# Altium PCB STM32_DevBoard.PcbDoc (part 1 of 2)
Units mm, origin at the board's own origin, x right, y up, seen from the top; angles counter-clockwise.
Board outline 80.64 x 69.55 mm, 2 copper layers (Top Layer, Bottom Layer); 79 components, 67 nets, 279 pads, 244 vias.
Unrouted connection lines stored in the file: 67.
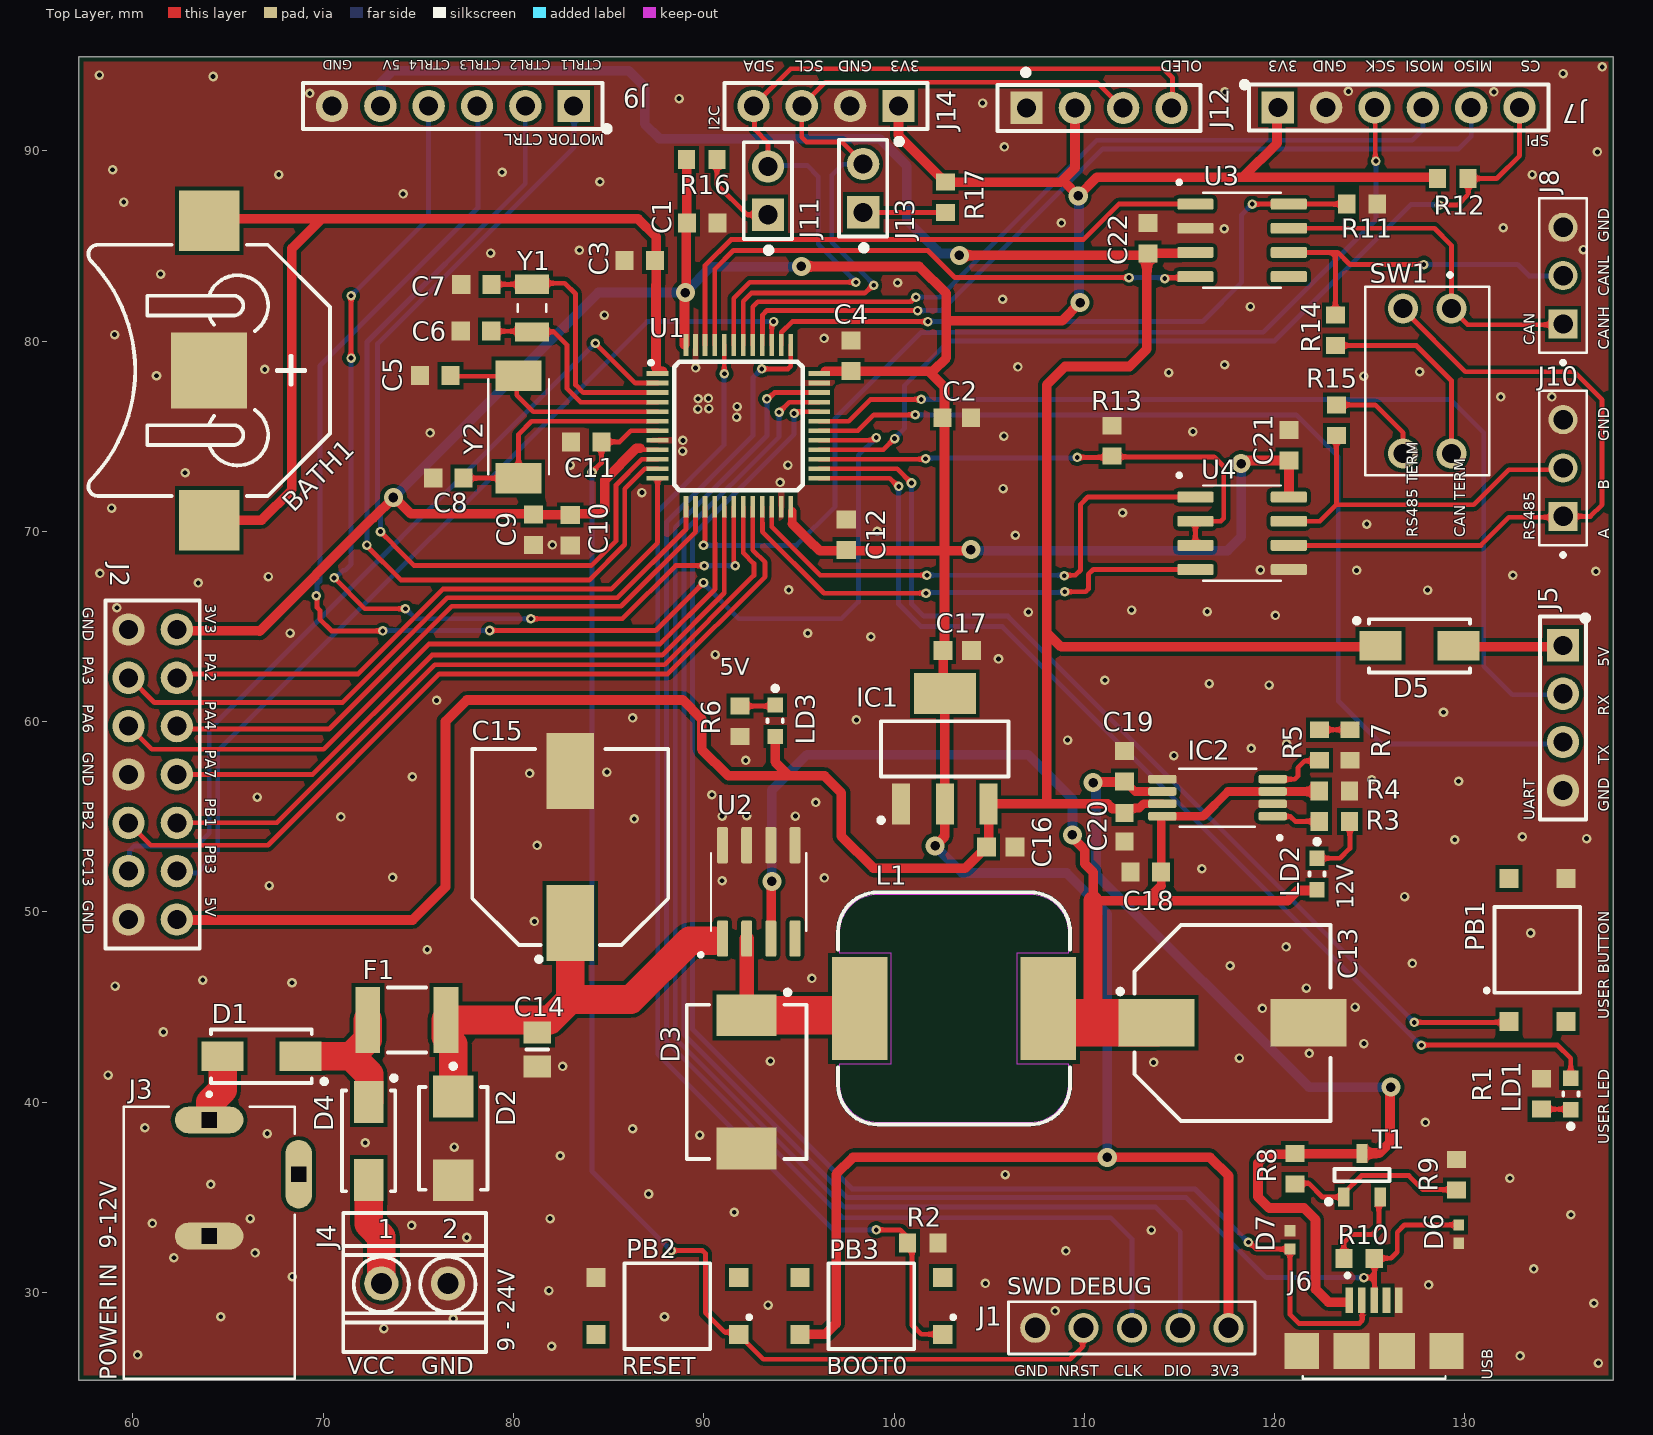
[diagram p0: Top Layer view]
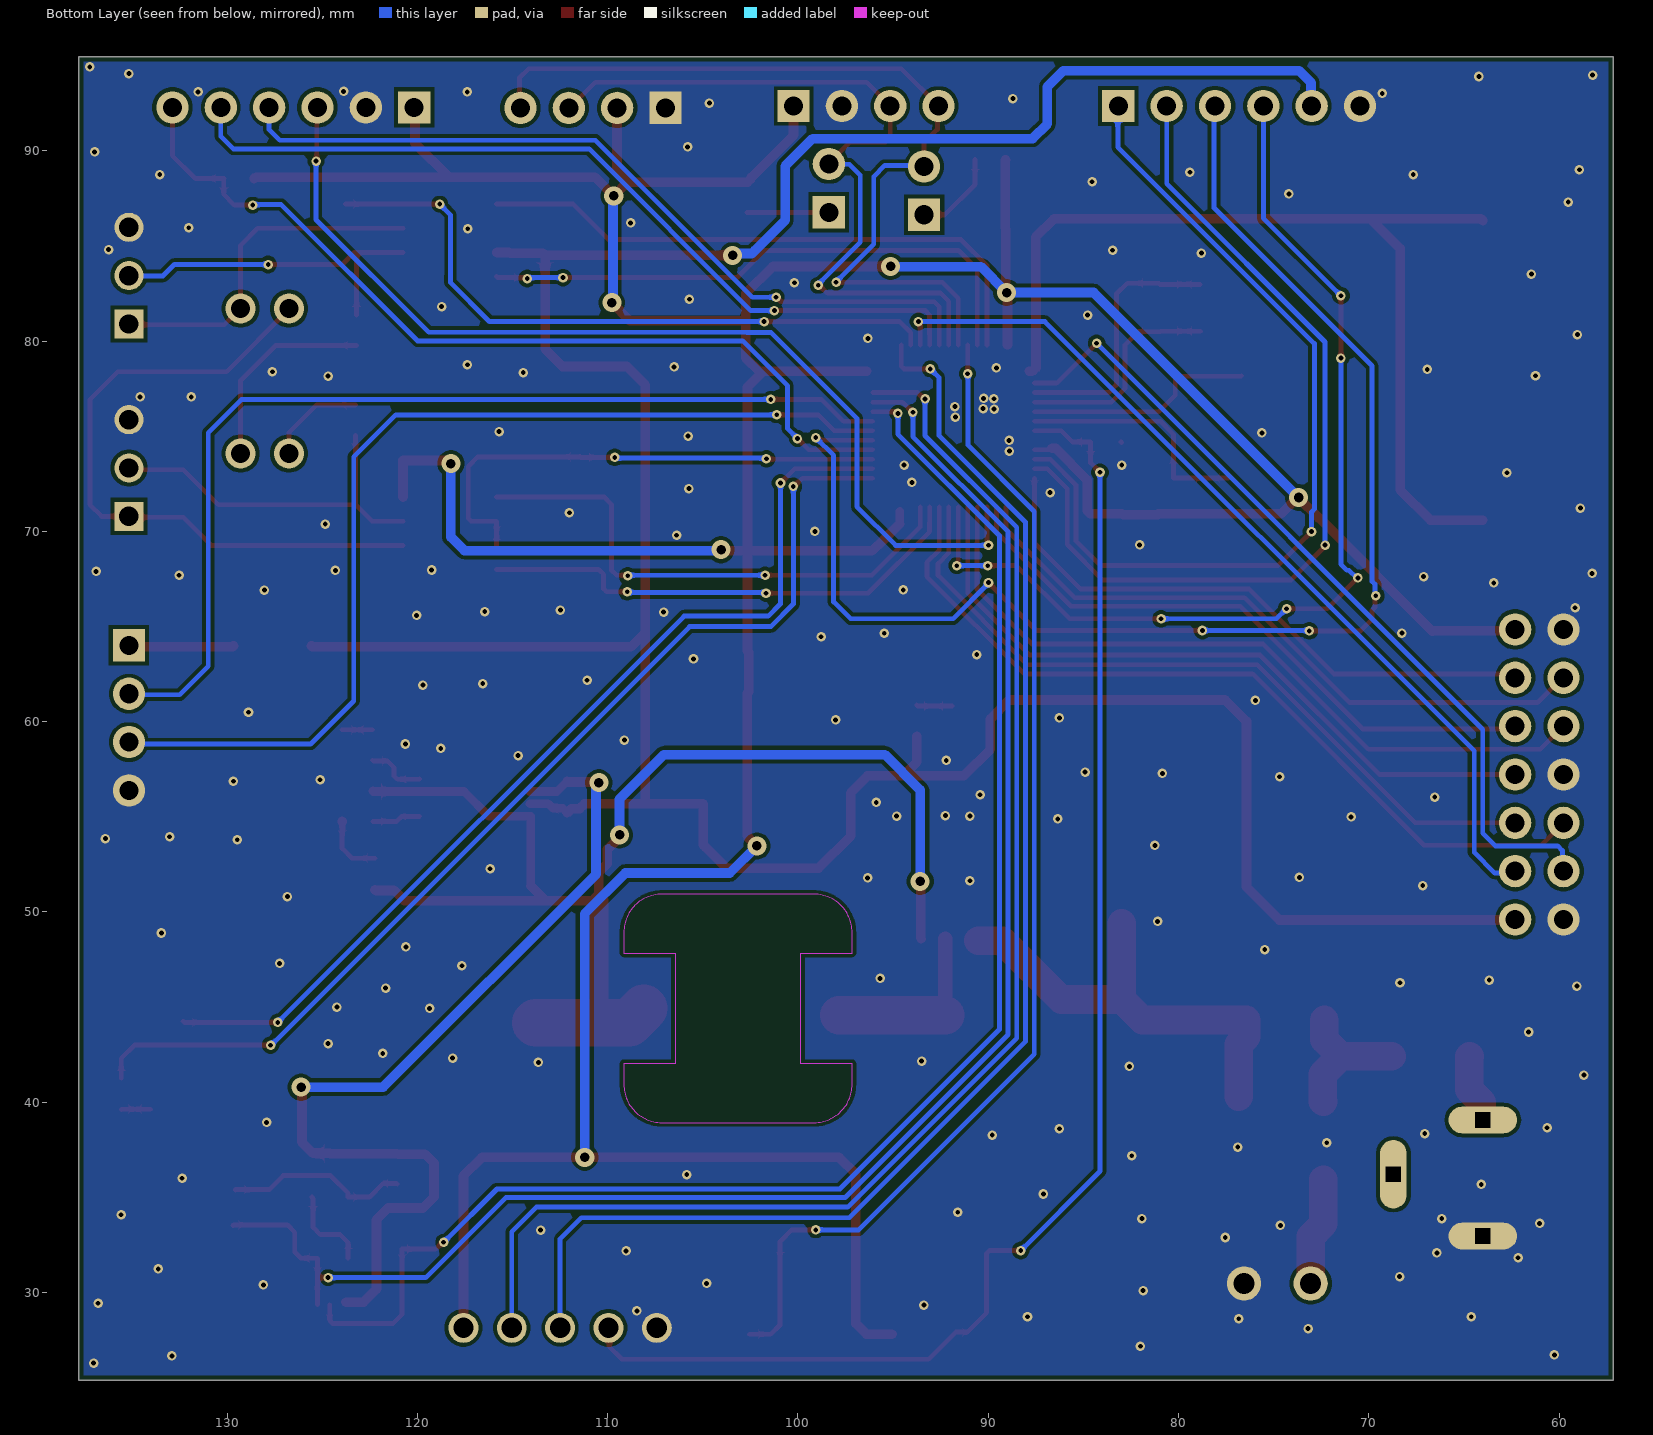
[diagram p1: Bottom Layer view, seen from below]
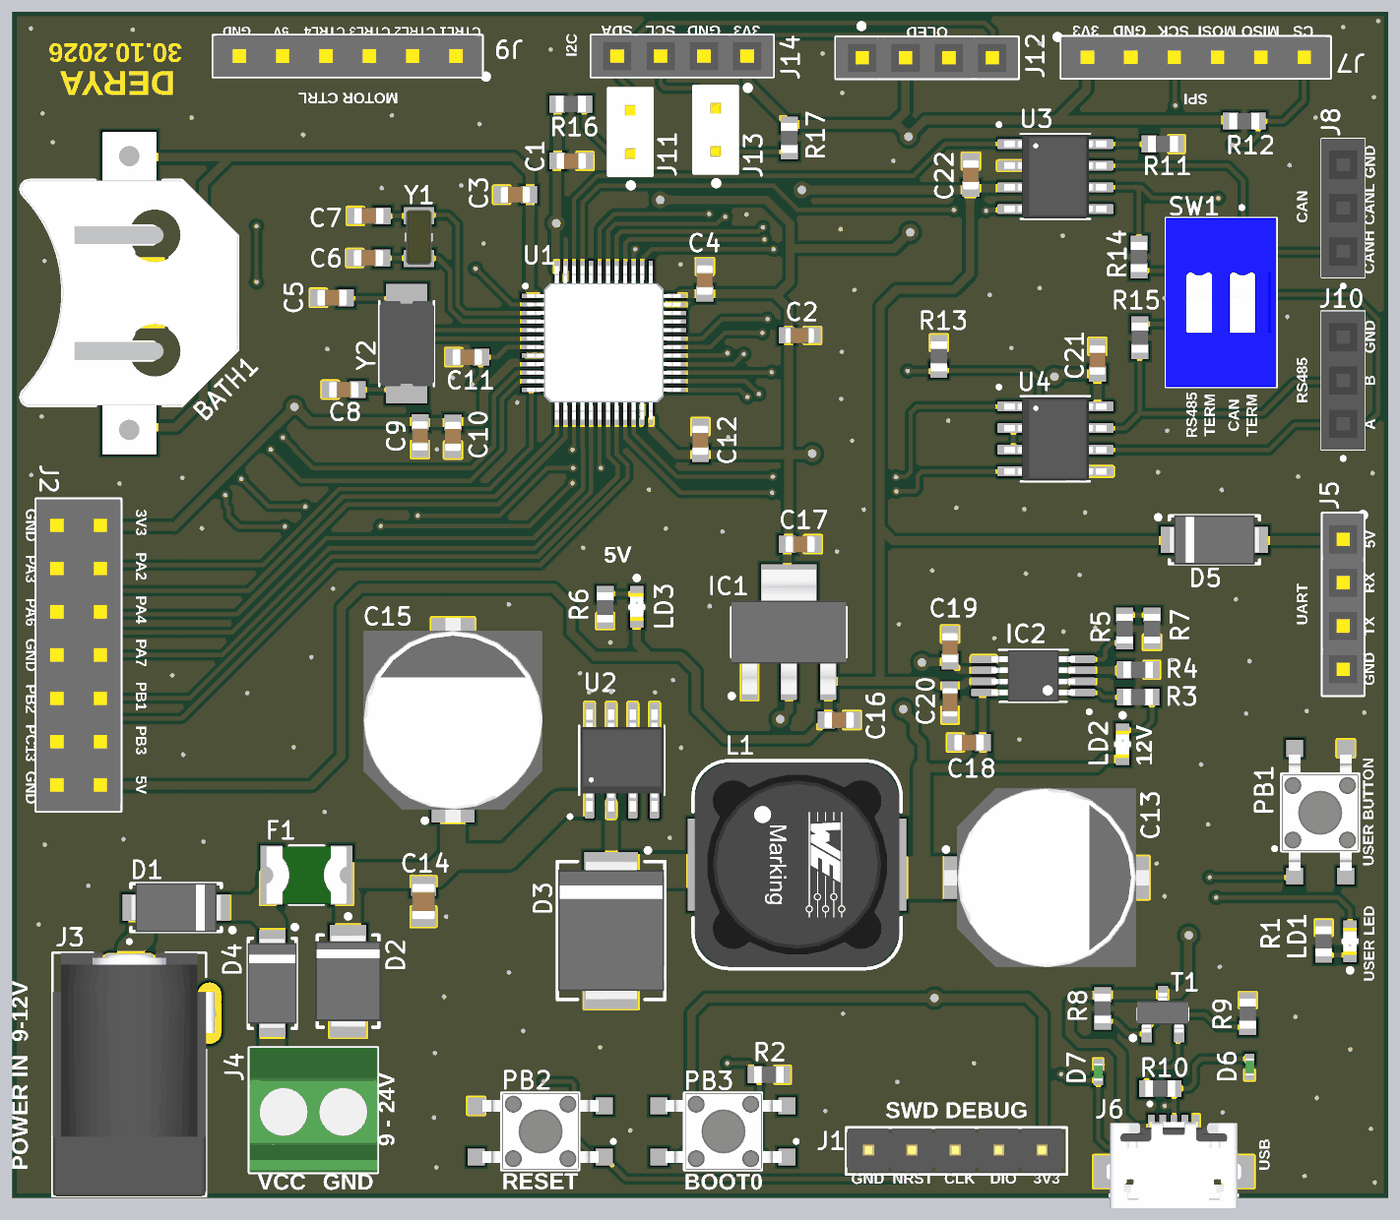
[diagram p3: 3D render of the assembled board from above, using the file's embedded part models]

## Layer stack, top to bottom
Top Solder: solder mask 0.0102, Solder Resist, Dk 3.5
Top Layer: signal copper 0.0356
Dielectric 1: dielectric 0.32, FR-4, Dk 4.8
Bottom Layer: signal copper 0.0356
Bottom Solder: solder mask 0.0102, Solder Resist, Dk 3.5

## Board outline
57.15,25.4 137.795,25.4 137.795,94.945 57.15,94.945

## Design rules (kind name [scope] priority, off if disabled: settings)
BoardOutlineClearance [All] p1: gap=0.254 ignorepadtopadclearanceinfootprint=FALSE except(0: Arc-SplitContinuation Track-SplitContinuation SMDPad-SplitContinuation THPad-SplitContinuation Via-SplitContinuation Fill-SplitContinuation Poly-SplitContinuation Region-SplitContinuation Text-OutlineEdge Text-SplitContinuation)
Clearance [All] p1: gap=0.2 ignorepadtopadclearanceinfootprint=FALSE
HoleSize [All] p1: absolutevalues=TRUE maxlimit=3 minlimit=0.025 maxpercent=80.000 minpercent=20.000
MinimumSolderMaskSliver [All] p1: minsoldermaskwidth=0.1
PolygonConnect PolygonConnect_1 [InNet('GND')] p1: connectstyle=Direct reliefconductorwidth=0.254 reliefentries=4 polygonreliefangle="90 Angle" airgapwidth=0.254
PolygonConnect [InNet('GND')] p2: connectstyle=Direct reliefconductorwidth=0.254 reliefentries=4 polygonreliefangle="90 Angle" airgapwidth=0.254
RoutingVias [All] p1: holewidth=0.256 width=0.5 viastyle="Through Hole" minholewidth=0.25 minwidth=0.5 maxholewidth=0.711 maxwidth=1.27
SilkToSilkClearance [All] p1: silktosilkclearance=0
SilkToSolderMaskClearance [IsPad] p1: minsilkscreentomaskgap=0.15 clearancetoexposedcopper=TRUE
SolderMaskExpansion SolderMask_STM32 [InComponent('U1') OR InComponent('J6')] p1: expansion=0.05 istentingtop=FALSE
SolderMaskExpansion [All] p2: expansion=0.102 istentingtop=FALSE
SupplyNets "Schematic Supply Nets_2" [InNet('+3V3')] p1: voltage=0.000
SupplyNets "Schematic Supply Nets_1" [InNet('+5V')] p2: voltage=0.000
SupplyNets "Schematic Supply Nets" [InNet('GND')] p3: voltage=0.000
Width [All] p1: maxlimit=5 minlimit=0.254 preferedwidth=0.254
26 further rules are at their usual default settings.

## Classes and differential pairs
component class Power: C13 C14 C15 C16 C17 C18 C19 C20 D1 D2 D3 D4 F1 IC1 IC2 J3 J4 L1 LD2 LD3 R3 R4 R5 R6 R7 U2
component class Core: BATH1 C1 C2 C3 C4 C5 C6 C7 C8 C9 C10 C11 C12 J1 J2 LD1 PB1 PB2 PB3 R1 R2 U1 Y1 Y2
component class Com: C21 C22 D5 D6 D7 J5 J6 J7 J8 J9 J10 J11 J12 J13 J14 R8 R9 R10 R11 R12 R13 R14 R15 R16 R17 SW1 T1 U3 U4

## Components (designator, comment, footprint, x,y, rotation, side; value= is the part's Value field where it differs from the comment)
BATH1 "=Value" BATH_KEYSTONE_3000 64.008,78.461 r90 top
C1 "100nF" CAPC1608X87N 89.916,86.208 r0 top
C2 "4.7uF" CAPC1608X90N 103.302,75.971 r180 top
C3 "100nF" CAPC1608X87N 86.639,84.226 r0 top
C4 "100nF" CAPC1608X87N 97.739,79.223 r90 top
C5 "10pF" CAPC1608X87N 75.895,78.181 r0 top
C6 "18pF" CAPC1608X87N 78.029,80.518 r0 top
C7 "18pF" CAPC1608X87N 78.054,82.982 r0 top
C8 "10pF" CAPC1608X87N 76.581,72.796 r0 top
C9 "1uF" CAPC1608X87N 81.051,70.079 r90 top
C10 "10nF" CAPC1608X87N 82.982,70.053 r90 top
C11 "100nF" CAPC1608X87N 83.82,74.701 r180 top
C12 "100nF" CAPC1608X87N 97.485,69.825 r90 top
C13 "220uF" CD035M221G10PKKKV00A 117.78,44.171 r0 top
C14 "1uF" CAPC2012X110N 81.255,42.774 r90 top
C15 "220uF" CD035M221G10PKKKV00A 82.982,53.416 r90 top
C16 "10uF" CAPC1608X80N 105.613,53.416 r180 top
C17 "10uF" CAPC1608X80N 103.327,63.729 r180 top
C18 "100nF" CAPC1608X87N 113.233,52.095 r180 top
C19 "100nF" CAPC1608X87N 112.116,57.658 r270 top
C20 "4.7uF" CAPC1608X90N 112.116,54.458 r90 top
C21 "100nF" CAPC1608X87N 120.752,74.524 r90 top
C22 "100nF" CAPC1608X87N 113.335,85.395 r270 top
D1 "SS16" DIOM5127X229N 66.751,42.418 r180 top
D2 "P6SMB24A" DIOM5436X261N 76.835,38.1 r270 top
D3 "SS34" DIOM7959X265N 92.253,41.072 r270 top
D4 "SS16" DIOM5127X229N 72.39,37.973 r270 top
D5 "SS16" DIOM5127X229N 127.61,63.983 r0 top
D6 "PGB1010402" LITTELFUSE_PGB1010402 129.668,33.071 r90 top
D7 "PGB1010402" LITTELFUSE_PGB1010402 120.802,32.766 r270 top
F1 "1.5A-6V" FUSRC4632X90N 74.397,44.323 r0 top
IC1 "SPX1117M3-L-1-8" SOT230P700X180-4N 102.667,58.572 r90 top
IC2 "TPS2115APWR" TPS2115APWR 116.992,56.007 r180 top
J1 "Pin Header 1x5" "Pin Header 1x5 2.54mm" 112.497,28.143 r180 top
J2 "Socket 14" SAMTEC_SSW-107-01-G-D 61.036,57.226 r270 top
J3 "5DJ20DC02-03T0BLB-01" 5DJ20DC02-03T0BLB-01 64.008,32.969 r0 top
J4 "" PHOENIX_1751248 74.803,30.48 r0 top
J5 "Socket 4" SAMTEC_SSW-104-02-L-S 135.153,60.198 r270 top
J6 "USB Micro B 5 Pin Female" "USB MICRO B" 125.228,29.599 r0 top
J7 "Socket 6" SAMTEC_SSW-106-01-L-S 126.517,92.278 r0 top
J8 "3 pin female header" "3 pin female hedaer" 135.153,83.439 r90 top
J9 "Socket 6" SAMTEC_SSW-106-01-L-S 76.81,92.354 r180 top
J10 "3 pin female header" "3 pin female hedaer" 135.153,73.33 r90 top
J11 "Header 2" SAMTEC_HTSW-101-23-L-D 93.37,87.909 r0 top
J12 "Socket 4" SAMTEC_SSW-104-02-L-S 110.769,92.253 r0 top
J13 "Header 2" SAMTEC_HTSW-101-23-L-D 98.374,88.036 r0 top
J14 "Socket 4" SAMTEC_SSW-104-02-L-S 96.418,92.354 r180 top
L1 "68uH" SRI1207-680M 103.149,44.933 r270 top
LD1 "Red" LED_KINGBRIGHT_KPH-1608SURCK 135.56,40.437 r90 top
LD2 "Red" LED_KINGBRIGHT_KPH-1608SURCK 122.225,51.994 r270 top
LD3 "Green" LED_KINGBRIGHT_KP-1608CGCK 93.751,60.046 r270 top
PB1 "4.5mm x 4.5mm" L-KLS7-TS4502-6.5-180-T 133.807,48.006 r90 top
PB2 "4.5mm x 4.5mm" L-KLS7-TS4502-6.5-180-T 88.087,29.286 r180 top
PB3 "4.5mm x 4.5mm" L-KLS7-TS4502-6.5-180-T 98.806,29.286 r180 top
R1 "2k2" RESC1608X55N 134.01,40.437 r270 top
R2 "10k" RESC1608X55N 101.498,32.614 r0 top
R3 "4k7" RESC1608X55N 123.139,54.762 r180 top
R4 "10k" RESC1608X55N 123.139,56.363 r180 top
R5 "220" RESC1608X64N 122.352,58.776 r270 top
R6 "5k1" RESC1608X55N 91.897,60.02 r90 top
R7 "220" RESC1608X64N 123.952,58.776 r90 top
R8 "10k" RESC1608X55N 121.056,36.5 r90 top
R9 "36k" RESC1608X55N 129.565,36.195 r270 top
R10 "1k5" RESC1608X55N 124.435,31.801 r0 top
R11 "10k" RESC1608X55N 124.587,87.198 r0 top
R12 "10k" RESC1608X55N 129.362,88.544 r0 top
R13 "10k" RESC1608X55N 111.455,74.752 r270 top
R14 "120" RESC1608X55N 123.19,80.569 r90 top
R15 "120" RESC1608X55N 123.241,75.844 r270 top
R16 "4k7" RESC1608X55N 89.891,89.535 r0 top
R17 "4k7" RESC1608X55N 102.692,87.554 r270 top
SW1 "DS1040" "DS1040 2-DIP SW" 128.016,77.902 r180 top
T1 "BC817-40" SOT95P230X110-3N 124.587,36.17 r90 top
U1 "STM32F303CBT6" STM32F303CBT6 91.821,75.54 r270 top
U2 "XL1509 Buck Converter" XL1509-5.0E1 92.888,51.054 r90 top
U3 "TPT1255" TPT1255 118.288,85.293 r0 top
U4 "TPT487" TPT487 118.288,69.901 r0 top
Y1 "RT3215" RT3215-32.768-12.5-TR 80.975,81.737 r270 top
Y2 "8MHz" H130A-8.000-8-2030-TR 80.264,75.489 r90 top

## Footprints (in the part's own frame and the unit in brackets; to place one, negate y for a bottom-side part, rotate by r counter-clockwise, add the part's x,y. Pads: shape width x height; smd on the part's side, far side on the other; paste and mask are expansions set on the pad)
"3 pin female hedaer" [mm]
  rect 1.53x1.53 hole 1.02 mask+0.102: 1(-2.54,0)
  round 1.53 hole 1.02 mask+0.102: 2(0,0) 3(2.54,0)
  silkscreen extent -4.67,-1.25 4.06,1.25, body extent -4.06,-1.27 4.06,1.27, height 8.51
5DJ20DC02-03T0BLB-01 [mm] "DC JACK"
  oval 3.6x1.4 hole 0.8 square: 1(0,6.1) 2(0,0)
  oval 1.4x3.6 hole 0.8 square: 3(4.7,3.25)
  silkscreen extent -4.5,-7.5 4.5,7.55, body extent -4.5,-7.5 5,6.8, height 11
BATH_KEYSTONE_3000 [mm] "SMD Battery Holder for BR1216, CR1216, BR1220, CL1220, CR1220, BR1225 Coin Cells"
  rect 3.175x3.175 smd: 1(-7.873,0) 1(7.873,0)
  rect 4x4 smd paste-2: 2(0,0)
  silkscreen extent -6.6,-6.35 6.6,6.35, body extent -9.46,-6.35 9.46,6.35, height 3.17
CAPC1608X80N [mm] "Chip Capacitor, Body 1.6x0.8mm IPC Medium Density"
  rect 1x1 smd: 1(-0.75,0) 2(0.75,0)
  body extent -0.87,-0.47 0.88,0.48, height 0.8
CAPC1608X87N [mm] "Chip Capacitor, Body 1.6x0.8mm IPC Medium Density"
  rect 0.95x1 smd: 1(-0.8,0) 2(0.8,0)
  body extent -0.87,-0.47 0.88,0.48, height 0.87
CAPC1608X90N [mm] "Chip Capacitor, Body 1.6x0.8mm IPC Medium Density"
  rect 0.95x0.95 smd: 1(-0.75,0) 2(0.75,0)
  body extent -0.85,-0.45 0.85,0.45, height 0.9
CAPC2012X110N [mm] "Chip Capacitor, Body 2.0x1.25mm, IPC Medium Density"
  rect 1.15x1.45 smd: 1(-0.9,0) 2(0.9,0)
  silkscreen extent 0,-0.58 0,0.58, body extent -1.05,-0.67 1.05,0.68, height 1.1
CD035M221G10PKKKV00A [mm]
  rect 4x2.5 smd: 1(-4,0) 2(4,0)
  silkscreen extent -6.02,-5.15 5.15,5.15, body extent -6,-5.25 6,5.25, height 10.2
DIOM5127X229N [mm] "DO-214-AC/SMA Diode, Molded Body; 5.10mm L X 2.67mm W X 2.29mm H, IPC Medium Density"
  rect 2.2x1.55 smd: 1(-2.05,0) 2(2.05,0)
  silkscreen extent -3.43,-1.4 2.65,1.45, body extent -2.67,-1.45 2.68,1.45, height 2.29
DIOM5436X261N [mm]
  rect 2.2x2.15 smd: 1(-2.2,0) 2(2.2,0)
  silkscreen extent -3.92,-1.8 2.7,1.8, body extent -2.7,-1.95 2.7,1.95, height 2.59
DIOM7959X265N [mm] "DO-214-AB/SMC Molded Diode, Body 7.9x5.9mm, IPC Medium Density"
  rect 2.2x3.15 smd: 1(-3.5,0) 2(3.5,0)
  silkscreen extent -4.82,-3.15 4.05,3.15, body extent -4.06,-3.11 4.07,3.11, height 2.65
"DS1040 2-DIP SW" [mm]
  round 1.58 hole 1: 1A(-1.27,-3.81) 1B(-1.27,3.81) 2A(1.27,-3.81) 2B(1.27,3.81)
  silkscreen extent -3.25,-5.67 3.25,4.95, body extent -3.23,-4.95 3.27,4.95, height 6.57
FUSRC4632X90N [mm] "Chip Resettable Fuse, 2-Leads, Body 4.6x3.2mm, IPC Medium Density"
  rect 1.3x3.45 smd: 1(-2.05,0) 2(2.05,0)
  silkscreen extent -1,-1.7 1,1.7, body extent -2.36,-1.7 2.37,1.71, height 0.89
H130A-8.000-8-2030-TR [mm]
  rect 1.6x2.4 smd paste+0 mask+0.102: 1(-2.7,0) 2(2.7,0)
  silkscreen extent -2.5,-1.6 2.5,1.6, body extent -2.5,-1.6 2.5,1.6, height 1.4
L-KLS7-TS4502-6.5-180-T [mm]
  rect 1x1 smd: 1(-3.75,1.5) 2(3.75,1.5) 3(-3.75,-1.5) 4(3.75,-1.5)
  silkscreen extent -2.25,-2.25 2.25,2.77, body extent -3.43,-2.25 3.37,2.25, height 5
LED_KINGBRIGHT_KP-1608CGCK [mm] "SMT Green LED, Case 0603, Body L 1.60mm x W 0.80mm x H 1.10mm"
  rect 0.8x0.8 smd: 1(-0.825,0) 2(0.825,0)
  silkscreen extent -1.82,-0.4 0.08,0.4, body extent -0.8,-0.4 0.8,0.4, height 1.1
LED_KINGBRIGHT_KPH-1608SURCK [mm] "SMT Hyper Red LED, Case 0603, Body L 1.6 x W 0.8mm H 0.65mm"
  rect 0.8x0.8 smd: 1(-0.825,0) 2(0.825,0)
  silkscreen extent -1.82,-0.4 0.08,0.4, body extent -0.8,-0.4 0.8,0.4, height 0.65
LITTELFUSE_PGB1010402 [mm] "0402, 2-Leads, Body 1mm L X 0.51mm W X 0.39mm H body"
  rect 0.585x0.56 smd: 1(-0.483,0) 2(0.483,0)
  body extent -0.49,-0.25 0.5,0.26, height 0.39
PHOENIX_1751248 [mm] "Terminal Block, 10A 160V, Pitch 3.5mm, 2 Positions, Screw Connection"
  round 1.8 hole 1.1: 1(-1.75,0) 2(1.75,0)
  silkscreen extent -3.75,-3.6 3.75,3.7, body extent -3.75,-3.6 3.75,3.7, height 8.5
"Pin Header 1x5 2.54mm" [mil]
  round 62 hole 42 mask+4.02: 1(-200,0) 2(-100,0) 3(0,0) 4(100,0) 5(200,0)
  silkscreen extent -255,-54 255,54, body extent -247,-52 253,48, height 339
RESC1608X55N [mm] "Chip Resistor, EIA 0603, Metric 1608, Body 1.6x0.8mm, IPC Medium Density"
  rect 0.9x1 smd: 1(-0.8,0) 2(0.8,0)
  body extent -0.87,-0.47 0.88,0.48, height 0.55
RESC1608X64N [mm] "Chip Resistor, EIA 0603, Metric 1608, Body 1.6x0.8mm, IPC Medium Density"
  rect 0.85x1 smd: 1(-0.8,0) 2(0.8,0)
  body extent -0.87,-0.47 0.88,0.48, height 0.64
RT3215-32.768-12.5-TR [mm]
  rect 1x1.8 smd: 1(-1.25,0) 2(1.25,0)
  silkscreen extent -0.2,-0.75 0.2,0.75, body extent -1.6,-0.75 1.6,0.75, height 0.9
SAMTEC_HTSW-101-23-L-D [mm] "2 Contacts - Pitch 2.54mm - Dual Row  Through Mount Straigh Header (Post Lead 5.84mm, Tail Lead 2.92mm, Insulator 2.54mm)"
  rect 1.7x1.7 hole 1: 1(0,-1.27)
  round 1.7 hole 1: 2(0,1.27)
  silkscreen extent -1.27,-3.28 1.27,2.54, body extent -1.27,-2.54 1.27,2.54, height 8.38
SAMTEC_SSW-104-02-L-S [mm] "4 Contacts, Pitch 2.54mm - Top Entry, Single Row, Through Mount Straigh Socket"
  rect 1.7x1.7 hole 1: 1(-3.81,0)
  round 1.7 hole 1: 2(-1.27,0) 3(1.27,0) 4(3.81,0)
  silkscreen extent -5.39,-1.21 5.33,1.31, body extent -5.33,-1.21 5.33,1.21, height 8.51
SAMTEC_SSW-106-01-L-S [mm] "6 Contacts, Pitch 2.54mm - Top Entry, Single Row, Through Mount Straigh Socket"
  rect 1.7x1.7 hole 1: 1(-6.35,0)
  round 1.7 hole 1: 2(-3.81,0) 3(-1.27,0) 4(1.27,0) 5(3.81,0) 6(6.35,0)
  silkscreen extent -8.25,-1.21 7.87,1.35, body extent -7.87,-1.21 7.87,1.21, height 8.51
SAMTEC_SSW-107-01-G-D [mm] "14 Contacts - Pitch 2.54mm - Double Row Through Mount Straight Socket (Lead Length 2.64mm)"
  round 1.7 hole 1: 1(-7.62,1.27) 2(-7.62,-1.27) 3(-5.08,1.27) 4(-5.08,-1.27) 5(-2.54,1.27) 6(-2.54,-1.27) 7(0,1.27) 8(0,-1.27) 9(2.54,1.27) 10(2.54,-1.27) 11(5.08,1.27) 12(5.08,-1.27) 13(7.62,1.27) 14(7.62,-1.27)
  silkscreen extent -9.14,-2.48 9.14,2.48, body extent -9.14,-2.48 9.14,2.48, height 8.51
SOT95P230X110-3N [mm] "SOT23, 3 pin, Pitch 0.95mm - 1.3mm W X 2.9mm L X 1.1mm H, IPC Medium Density"
  rect 1x0.6 smd: 1(-1.15,0.95) 2(-1.15,-0.95) 3(1.15,0)
  silkscreen extent -1.52,-1.45 0.33,1.87, body extent -1.08,-1.5 1.25,1.5, height 1.1
SOT230P700X180-4N [mm] "SOT223, 2.30mm pitch; 3 pin, 3.70mm W X 6.70mm L, IPC Medium Density"
  rect 2.15x0.95 smd: 1(-2.9,2.3) 2(-2.9,0) 3(-2.9,-2.3)
  rect 2.15x3.25 smd: 4(2.9,0)
  silkscreen extent -3.87,-3.35 1.45,3.47, body extent -3.65,-3.35 3.65,3.35, height 1.81
SRI1207-680M [mm]
  rect 5.4x2.9 smd: 1(0,-4.95) 2(0,4.95)
  Keep-Out Layer region: 4.105,5.997 4.209,5.989 4.313,5.975 4.416,5.956 4.518,5.932 4.618,5.902 4.717,5.867 4.813,5.827 4.908,5.782 5,5.732 5.089,5.677 5.176,5.618 5.259,5.554 5.338,5.486 5.414,5.414 5.486,5.338 5.554,5.259 5.618,5.176 5.677,5.089 5.732,5 5.782,4.908 5.827,4.813 5.867,4.717 5.902,4.618 5.932,4.518 5.956,4.416 5.975,4.313 5.989,4.209 5.997,4.105 6,4 6,-4 5.997,-4.105 5.989,-4.209 5.975,-4.313 5.956,-4.416 5.932,-4.518 5.902,-4.618 5.867,-4.717 5.827,-4.813 5.782,-4.908 5.732,-5 5.677,-5.089 5.618,-5.176 5.554,-5.259 5.486,-5.338 5.414,-5.414 5.338,-5.486 5.259,-5.554 5.176,-5.618 5.089,-5.677 5,-5.732 4.908,-5.782 4.813,-5.827 4.717,-5.867 4.618,-5.902 4.518,-5.932 4.416,-5.956 4.313,-5.975 4.209,-5.989 4.105,-5.997 4,-6 2.9,-6 2.9,-3.3 -2.9,-3.3 -2.9,-6 -4,-6 -4.105,-5.997 -4.209,-5.989 -4.313,-5.975 -4.416,-5.956 -4.518,-5.932 -4.618,-5.902 -4.717,-5.867 -4.813,-5.827 -4.908,-5.782 -5,-5.732 -5.089,-5.677 -5.176,-5.618 -5.259,-5.554 -5.338,-5.486 -5.414,-5.414 -5.486,-5.338 -5.554,-5.259 -5.618,-5.176 -5.677,-5.089 -5.732,-5 -5.782,-4.908 -5.827,-4.813 -5.867,-4.717 -5.902,-4.618 -5.932,-4.518 -5.956,-4.416 -5.975,-4.313 -5.989,-4.209 -5.997,-4.105 -6,-4 -6,4 -5.997,4.105 -5.989,4.209 -5.975,4.313 -5.956,4.416 -5.932,4.518 -5.902,4.618 -5.867,4.717 -5.827,4.813 -5.782,4.908 -5.732,5 -5.677,5.089 -5.618,5.176 -5.554,5.259 -5.486,5.338 -5.414,5.414 -5.338,5.486 -5.259,5.554 -5.176,5.618 -5.089,5.677 -5,5.732 -4.908,5.782 -4.813,5.827 -4.717,5.867 -4.618,5.902 -4.518,5.932 -4.416,5.956 -4.313,5.975 -4.209,5.989 -4.105,5.997 -4,6 -2.9,6 -2.9,3.3 2.9,3.3 2.9,6 4,6
  silkscreen extent -6.1,-6.1 6.1,6.1, body extent -6,-6 6,6, height 7.44
STM32F303CBT6 [mm]
  rect 0.254x1.143 smd: 1(-2.75,-4.25) 2(-2.25,-4.25) 3(-1.75,-4.25) 4(-1.25,-4.25) 5(-0.75,-4.25) 6(-0.25,-4.25) 7(0.25,-4.25) 8(0.75,-4.25) 9(1.25,-4.25) 10(1.75,-4.25) 11(2.25,-4.25) 12(2.75,-4.25) 25(2.75,4.25) 26(2.25,4.25) 27(1.75,4.25) 28(1.25,4.25) 29(0.75,4.25) 30(0.25,4.25) 31(-0.25,4.25) 32(-0.75,4.25) 33(-1.25,4.25) 34(-1.75,4.25) 35(-2.25,4.25) 36(-2.75,4.25)
  rect 1.143x0.254 smd: 13(4.25,-2.75) 14(4.25,-2.25) 15(4.25,-1.75) 16(4.25,-1.25) 17(4.25,-0.75) 18(4.25,-0.25) 19(4.25,0.25) 20(4.25,0.75) 21(4.25,1.25) 22(4.25,1.75) 23(4.25,2.25) 24(4.25,2.75) 37(-4.25,2.75) 38(-4.25,2.25) 39(-4.25,1.75) 40(-4.25,1.25) 41(-4.25,0.75) 42(-4.25,0.25) 43(-4.25,-0.25) 44(-4.25,-0.75) 45(-4.25,-1.25) 46(-4.25,-1.75) 47(-4.25,-2.25) 48(-4.25,-2.75)
  silkscreen extent -3.37,-4.6 3.37,3.37, body extent -4.5,-4.5 4.5,4.5, height 1.56
TPS2115APWR [mm]
  rrect50% 1.5x0.45 smd: D0(-2.9,0.325) D1(-2.9,-0.325) GND(2.9,-0.975) ILIM(-2.9,-0.975) IN1(2.9,0.975) IN2(2.9,-0.325) OUT(2.9,0.325) STAT(-2.9,0.975)
  silkscreen extent -3.38,-1.52 2.01,2.21, body extent -2.45,-1.5 2.45,1.5, height 1.1
TPT487 [mm]
  rrect25% 1.9x0.57 smd: !RE(-2.455,0.635) A(2.455,-0.635) B(2.455,0.635) D(-2.455,-1.905) DE(-2.455,-0.635) GND(2.455,-1.905) R(-2.455,1.905) VCC(2.455,1.905)
  silkscreen extent -3.4,-2.49 2.03,3.15, body extent -3,-2.45 3,2.45, height 1.75
TPT1255 [mm] "TPT1255 CAN TRANSCIEVER"
  rrect25% 1.9x0.57 smd: CANH(2.455,0.635) CANL(2.455,-0.635) GND(-2.455,0.635) NC(2.455,-1.905) RXD(-2.455,-1.905) S(2.455,1.905) TXD(-2.455,1.905) VCC(-2.455,-0.635)
  silkscreen extent -3.4,-2.49 2.03,3.15, body extent -3,-2.45 3,2.45, height 1.75
"USB MICRO B" [mm]
  rect 0.4x1.35 smd: 1(-1.3,0) 2(-0.65,0) 3(0,0) 4(0.65,0) 5(1.3,0)
  rect 1.8x1.9 smd: S3(-3.8,-2.675) S6(3.8,-2.675)
  rect 1.9x1.9 smd: S4(-1.2,-2.675) S5(1.2,-2.675)
  silkscreen extent -3.75,-4.13 3.75,1.4, body extent -3.95,-4.82 3.95,0.28, height 2.7
XL1509-5.0E1 [mm]
  rrect25% 1.9x0.57 smd: 1(-2.455,1.905) 2(-2.455,0.635) 3(-2.455,-0.635) 4(-2.455,-1.905) 5(2.455,-1.905) 6(2.455,-0.635) 7(2.455,0.635) 8(2.455,1.905)
  silkscreen extent -3.4,-2.49 2.03,3.15, body extent -3,-2.45 3,2.45, height 1.75

## Part data
BATH1: library part BATH_KEYSTONE_3000, "Battery Holder whit 2 Pin", Manufacturer=KEYSTONE, Manufacturer Part Number=3000, Author="CERN DEM JLC", Component Type=Standard, ComponentHeight=3.17mm, CreateDate=17.04.2012, Family=Battery, HelpURL=\\cern.ch\dfs\Applications\Altium\Datasheets\BATH_KEYSTONE_3000.pdf, LatestRevisionDate=7.06.2017, Mounted=Yes, PackageDescription="SMD Battery Holder for CR1216, BR1220, CL1225, SR1120, D381, 391, 191 Coin Cells", Part Description="SMD Battery Holder for CR1216, BR1220, CL1225, SR1120, D381, 391, 191 Coin Cells", Part Number=BATH_KEYSTONE_3000, Pin Count=3, PressFit=No, Sense=No, SMD=Yes, Socket=No
C1 C3 C4 C11 C12 C18 C19 C21 C22: library part CC0603_100NF_50V_10%_X5R, "Non-polarised capacitor", Case=0603, Manufacturer=GENERIC, Manufacturer1 ComponentHeight=0.9mm, Manufacturer1 Example=TDK, Manufacturer1 Part Number=C1608X5R1H104K080, Tolerance=±10%, Voltage=50V, Author="CERN DEM MR", Component Type=Standard, CreateDate=8.01.2016, HelpURL=\\cern.ch\dfs\Applications\Altium\Datasheets\CC0603_X5R_TDK_C.pdf, LatestRevisionDate=8.01.2016, Manufacturer Part Number=CC0603_100NF_50V_10%_X5R, Mounted=Yes, Part Description="SMD Multilayer Chip Ceramic Capacitor", Part Number=CC0603_100NF_50V_10%_X5R, Pin Count=2, Sense=No, SMD=Yes, Socket=No, Status=None, TC=X5R
C2 C20: library part CC0603_4.7UF_25V_10%_X5R, "Non-polarised capacitor", Case=0603, Manufacturer=GENERIC, Manufacturer1 ComponentHeight=0.95mm, Manufacturer1 Example=MURATA, Manufacturer1 Part Number=GRM188R61E475KE11D, Tolerance=±10%, Voltage=25V, Author="CERN DEM JLC", Component Type=Standard, CreateDate=10.11.2014, HelpURL=\\cern.ch\dfs\Applications\Altium\Datasheets\CC0603_MURATA_GRM188R61E475KE11D.pdf, LatestRevisionDate=10.11.2014, Manufacturer Part Number=CC0603_4.7UF_25V_10%_X5R, Mounted=Yes, Part Description="SMD Multilayer Chip Ceramic Capacitor", Part Number=CC0603_4.7UF_25V_10%_X5R, Pin Count=2, Sense=No, SMD=Yes, Socket=No, Status=None, TC=X5R
C5 C8: library part CC0603_10PF_50V_5%_NP0, "Non-polarised capacitor", Case=0603, Manufacturer=GENERIC, Manufacturer1 ComponentHeight=0.87mm, Manufacturer1 Example=PHYCOMP, Manufacturer1 Part Number=223886715109, Tolerance=±5%, Voltage=50V, Author="CERN DEM JLC", Component Type=Standard, CreateDate=3.12.2007, HelpURL=\\cern.ch\dfs\Applications\Altium\Datasheets\CC0603_NP0_PHYCOMP.pdf, LatestRevisionDate=3.12.2007, Manufacturer Part Number=CC0603_10PF_50V_5%_NP0, Mounted=Yes, Part Description="SMD Multilayer Chip Ceramic Capacitor", Part Number=CC0603_10PF_50V_5%_NP0, Pin Count=2, Sense=No, SMD=Yes, Socket=No, Status=Preferred, TC=C0G/NP0
C6 C7: library part CC0603_18PF_50V_5%_NP0, "Non-polarised capacitor", Case=0603, Manufacturer=GENERIC, Manufacturer1 ComponentHeight=0.87mm, Manufacturer1 Example=PHYCOMP, Manufacturer1 Part Number=223886715189, Tolerance=±5%, Voltage=50V, Author="CERN DEM JLC", Component Type=Standard, CreateDate=3.12.2007, HelpURL=\\cern.ch\dfs\Applications\Altium\Datasheets\CC0603_NP0_PHYCOMP.pdf, LatestRevisionDate=3.12.2007, Manufacturer Part Number=CC0603_18PF_50V_5%_NP0, Mounted=Yes, Part Description="SMD Multilayer Chip Ceramic Capacitor", Part Number=CC0603_18PF_50V_5%_NP0, Pin Count=2, Sense=No, SMD=Yes, Socket=No, Status=Preferred, TC=C0G/NP0
C9: library part CC0603_1UF_25V_10%_X7R, "Non-polarised capacitor", Case=0603, Manufacturer=GENERIC, Manufacturer1 ComponentHeight=0.9mm, Manufacturer1 Example=MURATA, Manufacturer1 Part Number=GRM188R71E105KA12D, Tolerance=±10%, Voltage=25V, Author="CERN DEM JLC", Component Type=Standard, CreateDate=18.01.2011, HelpURL=\\cern.ch\dfs\Applications\Altium\Datasheets\CC0603_X7R_MURATA.pdf, LatestRevisionDate=18.01.2011, Manufacturer Part Number=CC0603_1UF_25V_10%_X7R, Mounted=Yes, Part Description="SMD Multilayer Chip Ceramic Capacitor", Part Number=CC0603_1UF_25V_10%_X7R, Pin Count=2, Sense=No, SMD=Yes, Socket=No, Status=None, TC=X7R
C10: library part CC0603_10NF_50V_10%_X7R, "Non-polarised capacitor", Case=0603, Manufacturer=GENERIC, Manufacturer1 ComponentHeight=0.87mm, Manufacturer1 Example=PHYCOMP, Manufacturer1 Part Number=223858615636, Tolerance=±10%, Voltage=50V, Author="CERN DEM JLC", Component Type=Standard, CreateDate=3.12.2007, HelpURL=\\cern.ch\dfs\Applications\Altium\Datasheets\CC0603_X7R_PHYCOMP.pdf, LatestRevisionDate=3.12.2007, Manufacturer Part Number=CC0603_10NF_50V_10%_X7R, Mounted=Yes, Part Description="SMD Multilayer Chip Ceramic Capacitor", Part Number=CC0603_10NF_50V_10%_X7R, Pin Count=2, Sense=No, SMD=Yes, Socket=No, Status=Preferred, TC=X7R
C13 C15: library part CD035M221G10PKKKV00A, "CAP.ALU 220uF 35V 10x10 ±20% 3000 Hrs @ 105 °C Radial Electrolytic AEC-Q200 SMT"
C14: library part CC0805_1UF_50V_10%_X7R, "Non-polarised capacitor", Case=0805, Manufacturer=GENERIC, Manufacturer1 ComponentHeight=1.1mm, Manufacturer1 Example=KEMET, Manufacturer1 Part Number=C0805C105K5RACTU, Tolerance=±10%, Voltage=50V, Author="CERN DEM JLC", Component Type=Standard, CreateDate=4.12.2013, HelpURL=\\cern.ch\dfs\Applications\Altium\Datasheets\CC0805_X7R_KEMET.pdf, LatestRevisionDate=4.12.2013, Manufacturer Part Number=CC0805_1UF_50V_10%_X7R, Mounted=Yes, Part Description="SMD Multilayer Chip Ceramic Capacitor", Part Number=CC0805_1UF_50V_10%_X7R, Pin Count=2, Sense=No, SMD=Yes, Socket=No, Status=Preferred, TC=X7R
C16 C17: library part CC0603_10UF_10V_10%_X5R, "Non-polarised capacitor", Case=0603, Manufacturer=GENERIC, Manufacturer1 ComponentHeight=0.8mm, Manufacturer1 Example=MURATA, Manufacturer1 Part Number=GRM188R61A106KE69D, Tolerance=±10%, Voltage=10V, Author="CERN DEM JLC", Component Type=Standard, CreateDate=31.01.2017, HelpURL=\\cern.ch\dfs\Applications\Altium\Datasheets\CC0603_MURATA_GRM188R61A106KE69D.pdf, LatestRevisionDate=31.01.2017, Manufacturer Part Number=CC0603_10UF_10V_10%_X5R, Mounted=Yes, Part Description="SMD Multilayer Chip Ceramic Capacitor", Part Number=CC0603_10UF_10V_10%_X5R, Pin Count=2, Sense=No, SMD=Yes, Socket=No, Status=None, TC=X5R
D1 D4 D5: "Schottky Diode", Case=DO-214AC, Manufacturer="VISHAY GENERAL SEMICONDUCTOR", Power=1A, Voltage=60V, Author="CERN DEM JLC", Bonding=No, Component Type=Standard, ComponentHeight=2.29mm, CreateDate=15.07.2008, Device=SS16, HelpURL=\\cern.ch\dfs\Applications\Altium\Datasheets\SS16.pdf, LatestRevisionDate=23.08.2010, Manufacturer Part Number=SS16, Mounted=Yes, PackageDescription="DO-214-AC/SMA Diode, Molded Body; 5.10mm L X 2.67mm W X 2.29mm H, IPC Medium Density", Part Description="Surface Mount Schottky Barrier Rectifier", Part Number=SS16, Pin Count=2, PressFit=No, Sense=No, SMD=Yes, Socket=No
D2: "Transient Voltage Suppressor Diode (Uni-Directional)", Case=SMB, Manufacturer=LITTELFUSE, Power=600W, Voltage=24V, Author="CERN DEM JLC", Bonding=No, Component Type=Standard, ComponentHeight=2.61mm, CreateDate=12.07.2017, Device=P6SMB24A, HelpURL=\\cern.ch\dfs\Applications\Altium\Datasheets\P6SMB24A.pdf, LatestRevisionDate=12.07.2017, Manufacturer Part Number=P6SMB24A, Mounted=Yes, PackageDescription="DO-214-AA/SMB Diode, Molded Body; 5.40mm L X 3.62mm W X 2.61mm H, IPC Medium Density", Part Description="Uni-directional Transient Voltage Suppressor (TVS) Diode", Part Number=P6SMB24A, Pin Count=2, PressFit=No, Sense=No, SMD=Yes, Socket=No
D3: "Schottky Diode", Case=DO-214AB, Manufacturer="FAIRCHILD SEMICONDUCTOR", Power=3A, Voltage=40V, Author="CERN DEM JLC", Bonding=No, Component Type=Standard, ComponentHeight=2.65mm, CreateDate=23.08.2010, Device=SS34, HelpURL=\\cern.ch\dfs\Applications\Altium\Datasheets\SS34.pdf, LatestRevisionDate=8.11.2017, Manufacturer Part Number=SS34, Mounted=Yes, PackageDescription="DO-214-AB/SMC Molded Diode, Body 7.95x5.9mm, IPC Medium Density", Part Description="Surface Mount Schottky Barrier Rectifier", Part Number=SS34, Pin Count=2, PressFit=No, Sense=No, SMD=Yes, Socket=No
D6 D7: "Transient Voltage Suppressor Diode (Bi-Directional)", Case=0402, Manufacturer=LITTELFUSE, Voltage=12V, Author="CERN DEM BC", Bonding=No, Component Type=Standard, ComponentHeight=0.39mm, CreateDate=20.02.2019, Device=PGB1010402, HelpURL=\\cern.ch\dfs\Applications\Altium\Datasheets\PGB1010402.pdf, LatestRevisionDate=20.02.2019, Manufacturer Part Number=PGB1010402, Mounted=Yes, PackageDescription="0402, 2-Leads, Body 1mm L X 0.51mm W X 0.39mm H body", Part Description="Pulse-Guard ESD Surface Mount Polymeric Electrostatic Discharge Suppressor", Part Number=PGB1010402, Pin Count=2, PressFit=No, Sense=No, SMD=Yes, Socket=No
F1: library part FUSR1812_LITTELFUSE_MINISMDC150F-2, "Fuse", Manufacturer=LITTELFUSE, Manufacturer Part Number=miniSMDC150F-2, Author="CERN DEM MR", Component Type=Standard, ComponentHeight=0.76mm, CreateDate=20.07.2017, Family="Fuses Resettable", HelpURL=\\cern.ch\dfs\Applications\Altium\Datasheets\FUSR_LITTELFUSE_MINISMDC150F-2.pdf, LatestRevisionDate=17.08.2017, Mounted=Yes, PackageDescription="Chip Resettable Fuse, 2-Leads, Body 4.6x3.2mm, IPC Medium Density", Part Description="PolySwitch® PTC Overcurrent Protection Device", Part Number=FUSR1812_LITTELFUSE_MINISMDC150F-2, Pin Count=2, PressFit=No, Sense=No, SMD=Yes, Socket=No
IC1: "3-Terminal Regulator 1=GND 2=OUT 3=IN 4=OUT", Case=SOT223, Manufacturer=EXAR, Author="CERN DEM JLC", Bonding=No, Component Type=Standard, ComponentHeight=1.8mm, CreateDate=5.07.2011, Device=SPX1117M3-L-1-8, HelpURL=\\cern.ch\dfs\Applications\Altium\Datasheets\SPX1117M3-L-1-8.pdf, LatestRevisionDate=5.07.2011, Manufacturer Part Number=SPX1117M3-L-1-8, Mounted=Yes, PackageDescription="SOT223, 2.30mm Pitch; 4 Pin, 3.70mm W X 6.70mm L X 1.80mm H body, IPC Medium Density", Part Description="1.8V 800mA Low Dropout Voltage Regulator", Part Number=SPX1117M3-L-1-8, Pin Count=4, PressFit=No, Sense=No, SMD=Yes, Socket=No
IC2: library part "TPS2115APWR Autoswitching Power Mux", "IC-2115 OR CONTROLLER SRC SELECT 8-TSSOP"
J1: library part "Pin Header 1x5 2.54mm", "PIN HEADER 5PIN(1x5) 2.54mm THT V/T 3X6MM"
J2: library part SAMTEC_SSW-107-01-G-D, "Connector 14 Female", Manufacturer=SAMTEC, Manufacturer Part Number=SSW-107-01-G-D, Author="CERN DEM MR", Component Type=Standard, ComponentHeight=8.51mm, CreateDate=10.03.2016, Family="Socket 14", HelpURL=\\cern.ch\dfs\Applications\Altium\Datasheets\SAMTEC_SSW-107-01-G-D.pdf, LatestRevisionDate=10.03.2016, Mounted=Yes, Part Description="14 Contacts, Pitch 2.54mm, Dual Row Through Mount Straight Socket (Lead Length 2.64mm)", Part Number=SAMTEC_SSW-107-01-G-D, Pin Count=14, PressFit=No, Sense=No, SMD=No, Socket=No, Status=None
J3: "Connector, dc jack 5.5x2.1 mm, PCB mount, 90 degrees, nickel plated, PBT, thru hole"
J4: library part PHOENIX_1751248, "Terminal Block, 2 Positions, Screw Connection", Manufacturer="PHOENIX CONTACT", Manufacturer Part Number="1751248 (MKDS 1/ 2-3,5)", Author="CERN DEM JLC", Component Type=Standard, ComponentHeight=8.5mm, CreateDate=3.11.2009, HelpURL=\\cern.ch\dfs\Applications\Altium\Datasheets\PHOENIX_1751248.pdf, LatestRevisionDate=26.04.2010, Mounted=Yes, Part Description="10A 160V, Terminal Block, Pitch 3.5mm, 2 Positions, Screw Connection", Part Number=PHOENIX_1751248, Pin Count=2, PressFit=No, Sense=No, SMD=No, Socket=No, Status=None
J5 J12 J14: library part SAMTEC_SSW-104-02-L-S, "Connector 4 Female", Manufacturer=SAMTEC, Manufacturer Part Number=SSW-104-02-L-S, Author="CERN DEM JLC", Component Type=Standard, ComponentHeight=8.51mm, CreateDate=30.01.2012, Family="Socket 4", HelpURL=\\cern.ch\dfs\Applications\Altium\Datasheets\SAMTEC_SSW-104-02-L-S.pdf, LatestRevisionDate=30.01.2012, Mounted=Yes, Part Description="4 Contacts, Pitch 2.54mm, Single Row Through Mount Straight Socket (Lead Length 4.93mm)", Part Number=SAMTEC_SSW-104-02-L-S, Pin Count=4, PressFit=No, Sense=No, SMD=No, Socket=No, Status=None
J6: library part L-KLS1-233-0-0-0-T, "CONNECTOR USB MICRO B TYPE FEMALE SMT R/A W/O POST"
J7 J9: library part SAMTEC_SSW-106-01-L-S, "Connector 6 Female", Manufacturer=SAMTEC, Manufacturer Part Number=SSW-106-01-L-S, Author="CERN DEM BC", Component Type=Standard, ComponentHeight=8.51mm, CreateDate=29.09.2021, Family="Socket 6", HelpURL=\\cern.ch\dfs\Applications\Altium\Datasheets\SAMTEC_SSW-106-01-L-S.pdf, LatestRevisionDate=29.09.2021, Mounted=Yes, Part Description="6 Contacts, Pitch 2.54mm, Single Row Through Mount Straight Socket (Lead Length 2.64mm)", Part Number=SAMTEC_SSW-106-01-L-S, Pin Count=6, PressFit=No, Sense=No, SMD=No, Socket=No, Status=None
J8 J10: library part "3 Pin Female Header", "3 Pin Female Header 2.54mm pitch"
J11 J13: library part SAMTEC_HTSW-101-23-L-D, "Connector 2 Male", Manufacturer=SAMTEC, Manufacturer Part Number=HTSW-101-23-L-D, Author="CERN DEM JLC", Component Type=Standard, ComponentHeight=8.38mm, CreateDate=22.02.2018, Family="Header 2", HelpURL=\\cern.ch\dfs\Applications\Altium\Datasheets\SAMTEC_HTSW-101-23-L-D.pdf, LatestRevisionDate=22.02.2018, Mounted=Yes, Part Description="2 Contacts, Pitch 2.54mm, Dual Row Through Mount Straight Header (Post Lead 5.84mm, Tail Lead 2.92mm, Insulator 2.54mm)", Part Number=SAMTEC_HTSW-101-23-L-D, Pin Count=2, PressFit=No, Sense=No, SMD=No, Socket=No, Status=Preferred, Status Comment="High Temperature"
L1: library part SRI1207-680M, "INDUCTOR POWER 68UH 12X12MM SMD 3.8 A"
LD1 LD2: library part LED_KINGBRIGHT_KPH-1608SURCK, "LED Red 1C 2A", Case=0603, Manufacturer=KINGBRIGHT, Manufacturer Part Number=KPH-1608SURCK, Author="CERN DEM JLC", Bonding=No, Color=Red, Component Type=Standard, ComponentHeight=0.65mm, CreateDate=3.07.2017, HelpURL=\\cern.ch\dfs\Applications\Altium\Datasheets\LED_KINGBRIGHT_KPH-1608SURCK.pdf, LatestRevisionDate=3.07.2017, Mounted=Yes, PackageDescription="SMT Hyper Red LED, Case 0603, Body L 1.6 x W 0.8mm H 0.65mm", Part Description="SMD Hyper Red LED, Case 1.6mmX0.8mm(0603), 0.65mm Thickness", Part Number=LED_KINGBRIGHT_KPH-1608SURCK, Pin Count=2, PressFit=No, Sense=No, SMD=Yes, Socket=No
LD3: library part LED_KINGBRIGHT_KP-1608CGCK, "LED Green 1C 2A", Case=0603, Manufacturer=KINGBRIGHT, Manufacturer Part Number=KP-1608CGCK, Author="CERN DEM HF", Bonding=No, Color=Green, Component Type=Standard, ComponentHeight=1.1mm, CreateDate=1.10.2021, HelpURL=\\cern.ch\dfs\Applications\Altium\Datasheets\LED_KINGBRIGHT_KP-1608CGCK.pdf, LatestRevisionDate=1.10.2021, Mounted=Yes, PackageDescription="SMT Green LED, Case 0603, Body L 1.60mm x W 0.80mm x H 1.10mm", Part Description="1.6x0.8mm SMD Chip Green LED Lamp", Part Number=LED_KINGBRIGHT_KP-1608CGCK, Pin Count=2, PressFit=No, Sense=No, SMD=Yes, Socket=No
PB1 PB2 PB3: library part L-KLS7-TS4502-6.5-180-T, "SWITCH TACT 4.5x4.5MM 6.5MM 180gf SMD"
R1: library part R0603_2K2_1%_0.1W_100PPM, "Resistor - 1%", Case=0603, Manufacturer=GENERIC, Manufacturer1 ComponentHeight=0.55mm, Manufacturer1 Example="NIC COMPONENT", Manufacturer1 Part Number=NRC06F2201TRF, Power=0.1W, Tolerance=±1%, Author="CERN DEM JLC", Component Type=Standard, CreateDate=3.12.2007, HelpURL=\\cern.ch\dfs\Applications\Altium\Datasheets\R0603_NIC_NRC.pdf, LatestRevisionDate=13.03.2008, Manufacturer Part Number=R0603_2K2_1%_0.1W_100PPM, Mounted=Yes, Part Description="General Purpose Thick Film Chip Resistor", Part Number=R0603_2K2_1%_0.1W_100PPM, Pin Count=2, PressFit=No, Sense=No, SMD=Yes, Socket=No, Status=Preferred, TC=±100ppm/°C
R2 R4 R8 R11 R12 R13: library part R0603_10K_1%_0.1W_100PPM, "Resistor - 1%", Case=0603, Manufacturer=GENERIC, Manufacturer1 ComponentHeight=0.55mm, Manufacturer1 Example="NIC COMPONENT", Manufacturer1 Part Number=NRC06F1002TRF, Power=0.1W, Tolerance=±1%, Author="CERN DEM JLC", Component Type=Standard, CreateDate=3.12.2007, HelpURL=\\cern.ch\dfs\Applications\Altium\Datasheets\R0603_NIC_NRC.pdf, LatestRevisionDate=13.03.2008, Manufacturer Part Number=R0603_10K_1%_0.1W_100PPM, Mounted=Yes, Part Description="General Purpose Thick Film Chip Resistor", Part Number=R0603_10K_1%_0.1W_100PPM, Pin Count=2, PressFit=No, Sense=No, SMD=Yes, Socket=No, Status=Preferred, TC=±100ppm/°C
R3 R16 R17: library part R0603_4K7_1%_0.1W_100PPM, "Resistor - 1%", Case=0603, Manufacturer=GENERIC, Manufacturer1 ComponentHeight=0.55mm, Manufacturer1 Example="NIC COMPONENT", Manufacturer1 Part Number=NRC06F4701TRF, Power=0.1W, Tolerance=±1%, Author="CERN DEM JLC", Component Type=Standard, CreateDate=3.12.2007, HelpURL=\\cern.ch\dfs\Applications\Altium\Datasheets\R0603_NIC_NRC.pdf, LatestRevisionDate=13.03.2008, Manufacturer Part Number=R0603_4K7_1%_0.1W_100PPM, Mounted=Yes, Part Description="General Purpose Thick Film Chip Resistor", Part Number=R0603_4K7_1%_0.1W_100PPM, Pin Count=2, PressFit=No, Sense=No, SMD=Yes, Socket=No, Status=Preferred, TC=±100ppm/°C
R5 R7: library part R0603_220R_0.1%_0.1W_25PPM, "Resistor - 0.1%", Case=0603, Manufacturer=GENERIC, Manufacturer1 ComponentHeight=0.55mm, Manufacturer1 Example=PANASONIC, Manufacturer1 Part Number=ERA3AEB221V, Power=0.1W, Tolerance=±0.1%, Author="CERN DEM JLC", Component Type=Standard, CreateDate=12.01.2017, HelpURL=\\cern.ch\dfs\Applications\Altium\Datasheets\R0603_PANASONIC_ERA.pdf, LatestRevisionDate=12.01.2017, Manufacturer Part Number=R0603_220R_0.1%_0.1W_25PPM, Mounted=Yes, Part Description="Thin Film Chip Resistor", Part Number=R0603_220R_0.1%_0.1W_25PPM, Pin Count=2, PressFit=No, Sense=No, SMD=Yes, Socket=No, Status="Not Recommended", TC=±25ppm/°C
R6: library part R0603_5K1_1%_0.1W_100PPM, "Resistor - 1%", Case=0603, Manufacturer=GENERIC, Manufacturer1 ComponentHeight=0.55mm, Manufacturer1 Example="NIC COMPONENT", Manufacturer1 Part Number=NRC06F5101TRF, Power=0.1W, Tolerance=±1%, Author="CERN DEM JLC", Component Type=Standard, CreateDate=3.12.2007, HelpURL=\\cern.ch\dfs\Applications\Altium\Datasheets\R0603_NIC_NRC.pdf, LatestRevisionDate=13.03.2008, Manufacturer Part Number=R0603_5K1_1%_0.1W_100PPM, Mounted=Yes, Part Description="General Purpose Thick Film Chip Resistor", Part Number=R0603_5K1_1%_0.1W_100PPM, Pin Count=2, PressFit=No, Sense=No, SMD=Yes, Socket=No, Status=Preferred, TC=±100ppm/°C
R9: library part R0603_36K_1%_0.1W_100PPM, "Resistor - 1%", Case=0603, Manufacturer=GENERIC, Manufacturer1 ComponentHeight=0.55mm, Manufacturer1 Example="NIC COMPONENT", Manufacturer1 Part Number=NRC06F3602TRF, Power=0.1W, Tolerance=±1%, Author="CERN DEM JLC", Component Type=Standard, CreateDate=3.12.2007, HelpURL=\\cern.ch\dfs\Applications\Altium\Datasheets\R0603_NIC_NRC.pdf, LatestRevisionDate=13.03.2008, Manufacturer Part Number=R0603_36K_1%_0.1W_100PPM, Mounted=Yes, Part Description="General Purpose Thick Film Chip Resistor", Part Number=R0603_36K_1%_0.1W_100PPM, Pin Count=2, PressFit=No, Sense=No, SMD=Yes, Socket=No, Status=Preferred, TC=±100ppm/°C
R10: library part R0603_1K5_1%_0.1W_100PPM, "Resistor - 1%", Case=0603, Manufacturer=GENERIC, Manufacturer1 ComponentHeight=0.55mm, Manufacturer1 Example="NIC COMPONENT", Manufacturer1 Part Number=NRC06F1501TRF, Power=0.1W, Tolerance=±1%, Author="CERN DEM JLC", Component Type=Standard, CreateDate=3.12.2007, HelpURL=\\cern.ch\dfs\Applications\Altium\Datasheets\R0603_NIC_NRC.pdf, LatestRevisionDate=13.03.2008, Manufacturer Part Number=R0603_1K5_1%_0.1W_100PPM, Mounted=Yes, Part Description="General Purpose Thick Film Chip Resistor", Part Number=R0603_1K5_1%_0.1W_100PPM, Pin Count=2, PressFit=No, Sense=No, SMD=Yes, Socket=No, Status=Preferred, TC=±100ppm/°C
R14 R15: library part R0603_120R_1%_0.1W_100PPM, "Resistor - 1%", Case=0603, Manufacturer=GENERIC, Manufacturer1 ComponentHeight=0.55mm, Manufacturer1 Example="NIC COMPONENT", Manufacturer1 Part Number=NRC06F1200TRF, Power=0.1W, Tolerance=±1%, Author="CERN DEM JLC", Component Type=Standard, CreateDate=3.12.2007, HelpURL=\\cern.ch\dfs\Applications\Altium\Datasheets\R0603_NIC_NRC.pdf, LatestRevisionDate=13.03.2008, Manufacturer Part Number=R0603_120R_1%_0.1W_100PPM, Mounted=Yes, Part Description="General Purpose Thick Film Chip Resistor", Part Number=R0603_120R_1%_0.1W_100PPM, Pin Count=2, PressFit=No, Sense=No, SMD=Yes, Socket=No, Status=Preferred, TC=±100ppm/°C
SW1: library part "DS1040 2-DIP SW", "SWITCH DIP 2 Pos. SPST 100mA 24VDC THT V/T"
T1: "NPN Transistor", Case=SOT23-3, Manufacturer="NXP SEMICONDUCTORS", Author="CERN DEM BC", Bonding=No, Component Type=Standard, ComponentHeight=1.1mm, CreateDate=29.04.2020, Device=BC817-40, HelpURL=\\cern.ch\dfs\Applications\Altium\Datasheets\BC817-40.pdf, LatestRevisionDate=29.04.2020, Manufacturer Part Number=BC817-40, Mounted=Yes, PackageDescription="SOT23, 0.95mm Pitch; 3 Pin, 1.30mm W X 2.90mm L X 1.10mm H body, IPC Medium Density", Part Description="45V 500mA NPN General-Purpose Transistor", Part Number=BC817-40, Pin Count=3, PressFit=No, Sense=No, SMD=Yes, Socket=No
U2: library part XL1509-5.0E1, "IC-1509 REG BUCK DC/DC CONVERTER 5V 8SOP"
U3: library part "TPT1255 CAN TRANSCIEVER", "IC-1255 TRANSCEIVER CAN 8-SOP"
U4: library part "TPT487 RS485 Transciever", "IC-487 TRANSCEIVER 1/1 8-SOP"
Y1: library part RT3215-32.768-12.5-TR, "CRYSTAL 32.768kHz 12.5pF 20PPM SMD TR"
Y2: library part H130A-8.000-8-2030-TR, "CRYSTAL 8MHz 8pF 20PPM SMT"

## Via types
v1: diameter 0.5, hole 0.256, Top Layer to Bottom Layer, tented both sides, 179 vias
v2: diameter 0.5, hole 0.25, Top Layer to Bottom Layer, tented both sides, 51 vias
v3: diameter 1, hole 0.5, Top Layer to Bottom Layer, tented both sides, 14 vias

## Nets (pads, with @x,y where several pads share a name; then routed paths per layer and width w, separated by ;. In a path a pad name is that pad's centre, name@x,y a point inside that pad or via, vN(x,y) a via of type N, cw(c..) or ccw(c..) an arc to the next point about the centre after c; other vN are vias at no path point)
+3V3: C1.1 C2.2 C4.1 C9.2 C10.2 C12.1 C17.2 C21.1 IC1.2 IC1.4 J1.1 J2.1 J7.1 J12.2 J14.1 PB3.2 R12.1 R16.1 R17.1 U1.9 U1.24 U1.36 U1.48 U4.VCC | length 260.3
  Top Layer w0.254: 86.652,74.371 86.733,74.29 U1.9@87.571,74.29
  Top Layer w0.45: 94.64,70.409 U1.24@94.64,71.061
  Top Layer w0.508: J2.1@62.306,64.846 62.382,64.77 66.497,64.77 ; 66.65,64.745 72.6,70.695 72.627,70.695 73.685,71.754 v3(73.685,71.78) 73.746,71.78 74.608,70.918 81.051,70.918 81.104,70.866 82.93,70.866 82.982,70.918 84.632,70.918 84.797,71.084 84.797,72.708 86.46,74.371 86.652,74.371 ; U1.48@88.99,79.807 88.99,82.513 v3(89.027,82.55) 89.072,82.595 89.072,85.909 89.103,85.941 89.103,89.522 R16.1@89.091,89.535 ; 94.64,70.409 95.786,69.263 95.811,69.263 96.088,68.986 99.133,68.986 ; PB3.2@95.056,27.812 96.392,27.812 96.952,28.372 96.952,36.22 97.841,37.109 v3(111.201,37.109) 116.611,37.109 117.577,36.144 J1.1@117.577,28.143 ; v3(95.123,83.922) 101.32,83.922 102.743,82.499 102.743,81.077 ; 96.388,78.417 96.391,78.419 101.813,78.419 ; 99.136,68.986 102.648,68.986 ; J14.1@100.233,92.35 100.233,90.813 102.446,88.6 102.446,88.55 102.642,88.354 R17.1@102.692,88.354 108.762,88.354 109.504,89.096 J12.2@109.504,92.248 ; v3(102.159,53.467) 102.667,53.975 IC1.2@102.667,55.672 IC1.4@102.667,61.472 ; IC1.4@102.648,61.491 102.577,61.562 102.577,63.658 102.648,63.729 102.648,68.986 ; v3(104.038,69.037) 103.988,68.986 102.648,68.986 ; 108.953,88.354 v3(109.677,87.63) 110.662,88.615 118.343,88.615 ; v3(109.779,82.017) 108.839,81.077 102.743,81.077 ; v3(118.237,73.558) 118.37,73.558 118.535,73.724 C21.1@120.752,73.724 120.752,71.815 U4.VCC@120.743,71.806 ; J7.1@120.127,92.278 120.121,92.273 120.121,90.393 118.343,88.615 ; R12.1@128.562,88.544 128.492,88.615 118.343,88.615 ; 101.813,78.419 102.648,77.584 102.648,68.986 ; 101.813,78.419 102.041,78.419 102.743,79.121 102.743,81.077
  Bottom Layer w0.508: v3(73.685,71.78) 84.455,82.55 v3(89.027,82.55) 90.387,83.91 95.111,83.91 v3(95.123,83.922) ; v3(102.159,53.467) 103.581,52.045 109.068,52.045 111.201,49.911 v3(111.201,37.109) ; v3(104.038,69.037) 104.089,68.986 117.526,68.986 118.237,69.698 v3(118.237,73.558) ; v3(109.677,87.63) 109.715,87.592 109.715,82.08 v3(109.779,82.017)